# Altium PCB LDO.PcbDoc
Units mm, origin at the board's own origin, x right, y up, seen from the top; angles counter-clockwise.
Board outline 25.53 x 9.02 mm, 2 copper layers (Top Layer, Bottom Layer); 6 components, 4 nets, 15 pads, 34 vias.
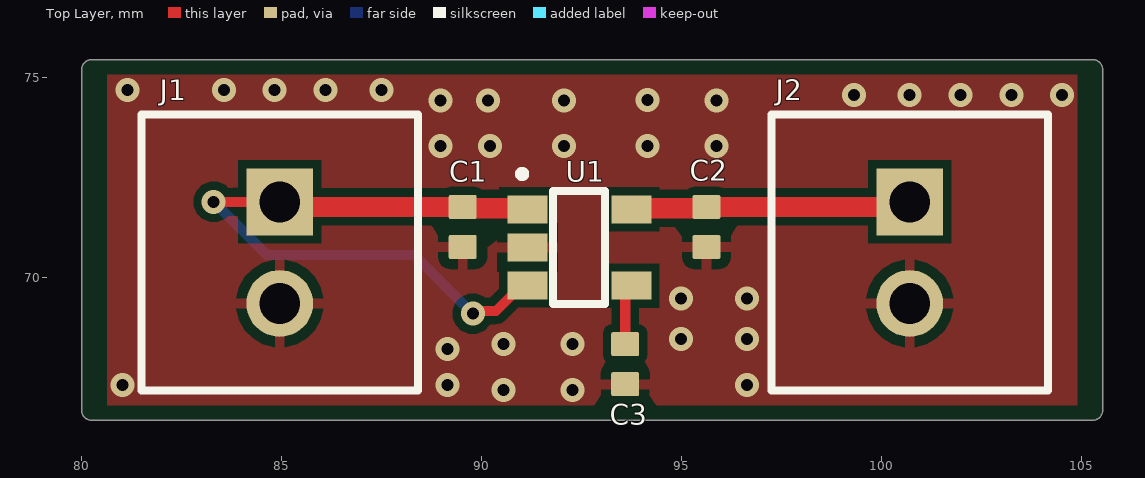
[diagram p0: Top Layer view]
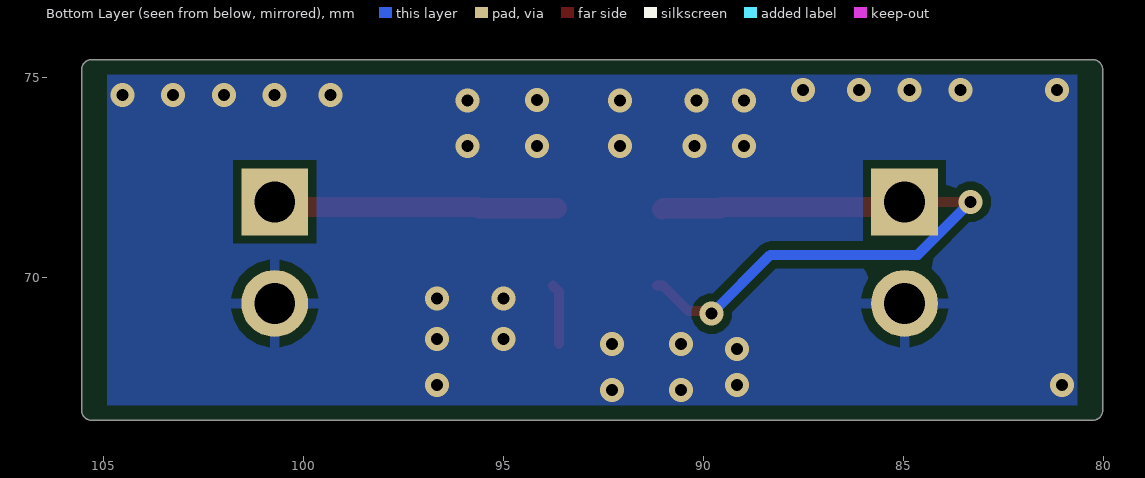
[diagram p1: Bottom Layer view, seen from below]
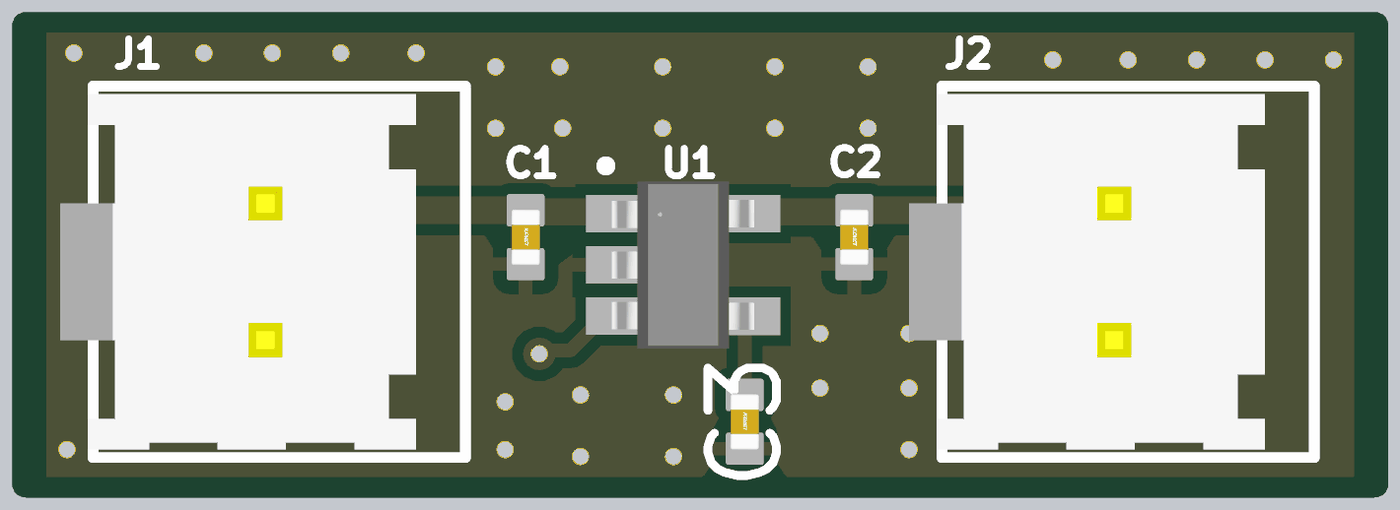
[diagram p2: 3D render of the assembled board from above, using the file's embedded part models]

## Layer stack, top to bottom
Top Solder: solder mask 0.0102, Solder Resist, Dk 3.5
Top Layer: signal copper 0.0356
Dielectric 1: dielectric 0.32, FR-4, Dk 4.8
Bottom Layer: signal copper 0.0356
Bottom Solder: solder mask 0.0102, Solder Resist, Dk 3.5

## Board outline
80.01,66.675 80.01,75.184 cw(c80.264,75.184) 80.264,75.438 105.283,75.438 cw(c105.283,75.184) 105.537,75.184 105.537,66.675 cw(c105.283,66.675) 105.283,66.421 80.264,66.421 cw(c80.264,66.675)

## Design rules (kind name [scope] priority, off if disabled: settings)
Clearance [All] p1: gap=0.2 ignorepadtopadclearanceinfootprint=FALSE
MinimumSolderMaskSliver [All] p1: minsoldermaskwidth=0.102
PolygonConnect [All] p1: connectstyle=Relief reliefconductorwidth=0.254 reliefentries=4 polygonreliefangle="90 Angle" airgapwidth=0.254
RoutingVias [All] p1: holewidth=0.711 width=1.27 viastyle="Through Hole" minholewidth=0.711 minwidth=1.27 maxholewidth=0.711 maxwidth=1.27
SolderMaskExpansion [All] p1: expansion=0 istentingtop=FALSE
SupplyNets "Schematic Supply Nets_2" [InNet('3.3V')] p1: voltage=0.000
SupplyNets "Schematic Supply Nets_1" [InNet('5V')] p2: voltage=0.000
SupplyNets "Schematic Supply Nets" [InNet('GND')] p3: voltage=0.000
Width [All] p1: maxlimit=1.016 minlimit=0.254 preferedwidth=0.254
29 further rules are at their usual default settings.

## Components (designator, comment, footprint, x,y, rotation, side; value= is the part's Value field where it differs from the comment)
C1 "Capacitor" CAP0402 89.535,71.255 r270 top value=4.7µF
C2 "Capacitor" CAP0402 95.631,71.255 r270 top value=4.7µF
C3 "Capacitor" CAP0402 93.599,67.826 r270 top value=100pF
J1 "IPL1-102-01-S-S-K" FP-IPL1-102-01-S-S-K-0 84.963,70.612 r0 top
J2 "IPL1-102-01-S-S-K" FP-IPL1-102-01-S-S-K-0 100.711,70.612 r0 top
U1 "AP2210K-3.3TRG1" "AP2210  300MA RF ULDO REGULATOR" 92.456,70.739 r270 top

## Footprints (in the part's own frame and the unit in brackets; to place one, negate y for a bottom-side part, rotate by r counter-clockwise, add the part's x,y. Pads: shape width x height; smd on the part's side, far side on the other; paste and mask are expansions set on the pad)
"AP2210  300MA RF ULDO REGULATOR" [mm]
  rect 0.7x1 smd: 1(-0.952,-1.3) 2(-0.002,-1.3) 3(0.947,-1.3) 4(0.952,1.3) 5(-0.953,1.3)
  silkscreen extent -1.89,-1.48 1.41,0.64, body extent -1.55,-1.32 1.55,1.32, height 1.45
CAP0402 [mm] "Chip Capacitor, Body 1x0.5mm, Height 0.35mm, IPC Medium Density"
  rrect15% 0.6x0.7 smd: 1(-0.5,0) 2(0.5,0)
  body extent -0.53,-0.28 0.52,0.27, height 0.54
FP-IPL1-102-01-S-S-K-0 [mm]
  rect 1.67x1.67 hole 1.02 paste-2539.97 mask+0: 1(0,1.27)
  round 1.67 hole 1.02 paste-2539.97 mask+0: 2(0,-1.27)
  silkscreen extent -3.45,-3.45 3.45,3.45, body extent -3.55,-3.55 3.55,3.55, height 0.25

## Part data
C1: "GRM188R61E475KE11D", TEMP="-55~85 °C", CPAR=25V, SimulationGenericComponent=True
C2: "GRM188R61E475KE11D", TEMP=-55~85°C, CPAR=25V, SimulationGenericComponent=True
C3: "GRM1555C1H101JA01D", TEMP=-55~125°C, CPAR=50V, SimulationGenericComponent=True
J1 J2: library part CMP-02766-000483-1, "2 Position 1 Row .100\" (2.54 mm) pitch connector", Color=Natural, Max Current Rating=7.4A, Max Operating Temperature=125°C, Max Voltage Rating (AC)=675V, Min Operating Temperature=-55°C, Package Quantity=1, Connector Type="Male Pin", Contact Material=Bronze, Contact Mating Length=0.215inch, Contact Plating=Gold, Fastening Type=Ramp, Gender=Male, Housing Material=Polymer, Length=6.6mm, Mount="Through Hole", Number of Contacts=2, Number of Ports=1, Number of Positions=2, Number of Rows=1, Number of Terminals/Pins=2, Orientation=Straight, Packaging=Rail/Tube, Pitch=2.54mm, Radiation Hardening=No, Termination=Solder
U1: "IC REG LINEAR 3.3V 300MA SOT23-5", Manufacturer 1="Diodes Incorporated", Supplier Part Number 1=AP2210K-3.3TRG1DITR-ND, Manufacturer Part Number 1=AP2210K-3.3TRG1, Supplier 1=DigiKey

## Via types
v1: diameter 0.6, hole 0.3, Top Layer to Bottom Layer, tented both sides, 34 vias

## Nets (pads, with @x,y where several pads share a name; then routed paths per layer and width w, separated by ;. In a path a pad name is that pad's centre, name@x,y a point inside that pad or via, vN(x,y) a via of type N, cw(c..) or ccw(c..) an arc to the next point about the centre after c; other vN are vias at no path point)
3.3V: C2.1 J2.1 U1.5 | length 7.2
  Top Layer w0.254: U1.5@93.629,71.691 U1.5@93.661,71.723 ; C2.1@95.599,71.723 C2.1 ; J2.1@100.584,71.755 J2.1
  Top Layer w0.508: U1.5@93.661,71.723 C2.1@95.599,71.723 ; C2.1 J2.1@100.584,71.755
5V: C1.1 J1.1 U1.1 U1.3 | length 17
  Top Layer w0.254: v1(83.312,71.882) J1.1 ; v1(89.789,69.088) 89.855,69.154 90.369,69.154 91.006,69.792 U1.3
  Top Layer w0.508: J1.1@84.963,71.755 C1.1 89.567,71.723 90.997,71.723 U1.1@91.029,71.691
  Bottom Layer w0.254: v1(83.312,71.882) 84.636,70.558 88.319,70.558 v1(89.789,69.088)
GND: C1.2 C2.2 C3.2 J1.2 J2.2 U1.2
  other v1: 90.551,67.183 92.279,67.182 81.026,67.31 89.154,67.31 96.647,67.31 89.154,68.199 90.551,68.326 92.279,68.325 94.996,68.453 96.647,68.453 94.996,69.469 96.647,69.469 88.977,73.278 90.22,73.28 92.075,73.279 94.157,73.28 95.885,73.279 88.977,74.421 90.17,74.422 92.075,74.422 94.157,74.423 95.885,74.422 99.314,74.549 100.711,74.549 101.981,74.549 103.251,74.549 104.521,74.549 81.153,74.676 83.566,74.676 84.836,74.676 86.106,74.676 87.503,74.676
NetC3_1: C3.1 U1.4 | length 1.5
  Top Layer w0.254: C3.1 93.599,69.63 U1.4

## Polygon pours and split planes (outlines as drawn)
GND on Bottom Layer "GND_L02_P005" (solid, remove dead copper, pour order 5): 80.645,75.057 104.902,75.057 104.902,66.802 80.645,66.802
GND on Top Layer "GND_L01_P007" (solid, remove dead copper, pour order 7): 80.645,75.057 80.645,66.802 104.902,66.802 104.902,75.057

## Silkscreen, mask and mechanical layers (free items; w line width, h text height)
M1 Board Outline:
  the board outline again, w0.254